# Altium PCB DATALOGER_RevA.PcbDoc (part 1 of 3)
Units mil, origin at the board's own origin, x right, y up, seen from the top; angles counter-clockwise.
Board outline 3937.01 x 3149.61 mil, 2 copper layers (Top Layer, Bottom Layer), stack 62.19 mil thick; 129 components, 81 nets, 422 pads, 180 vias.
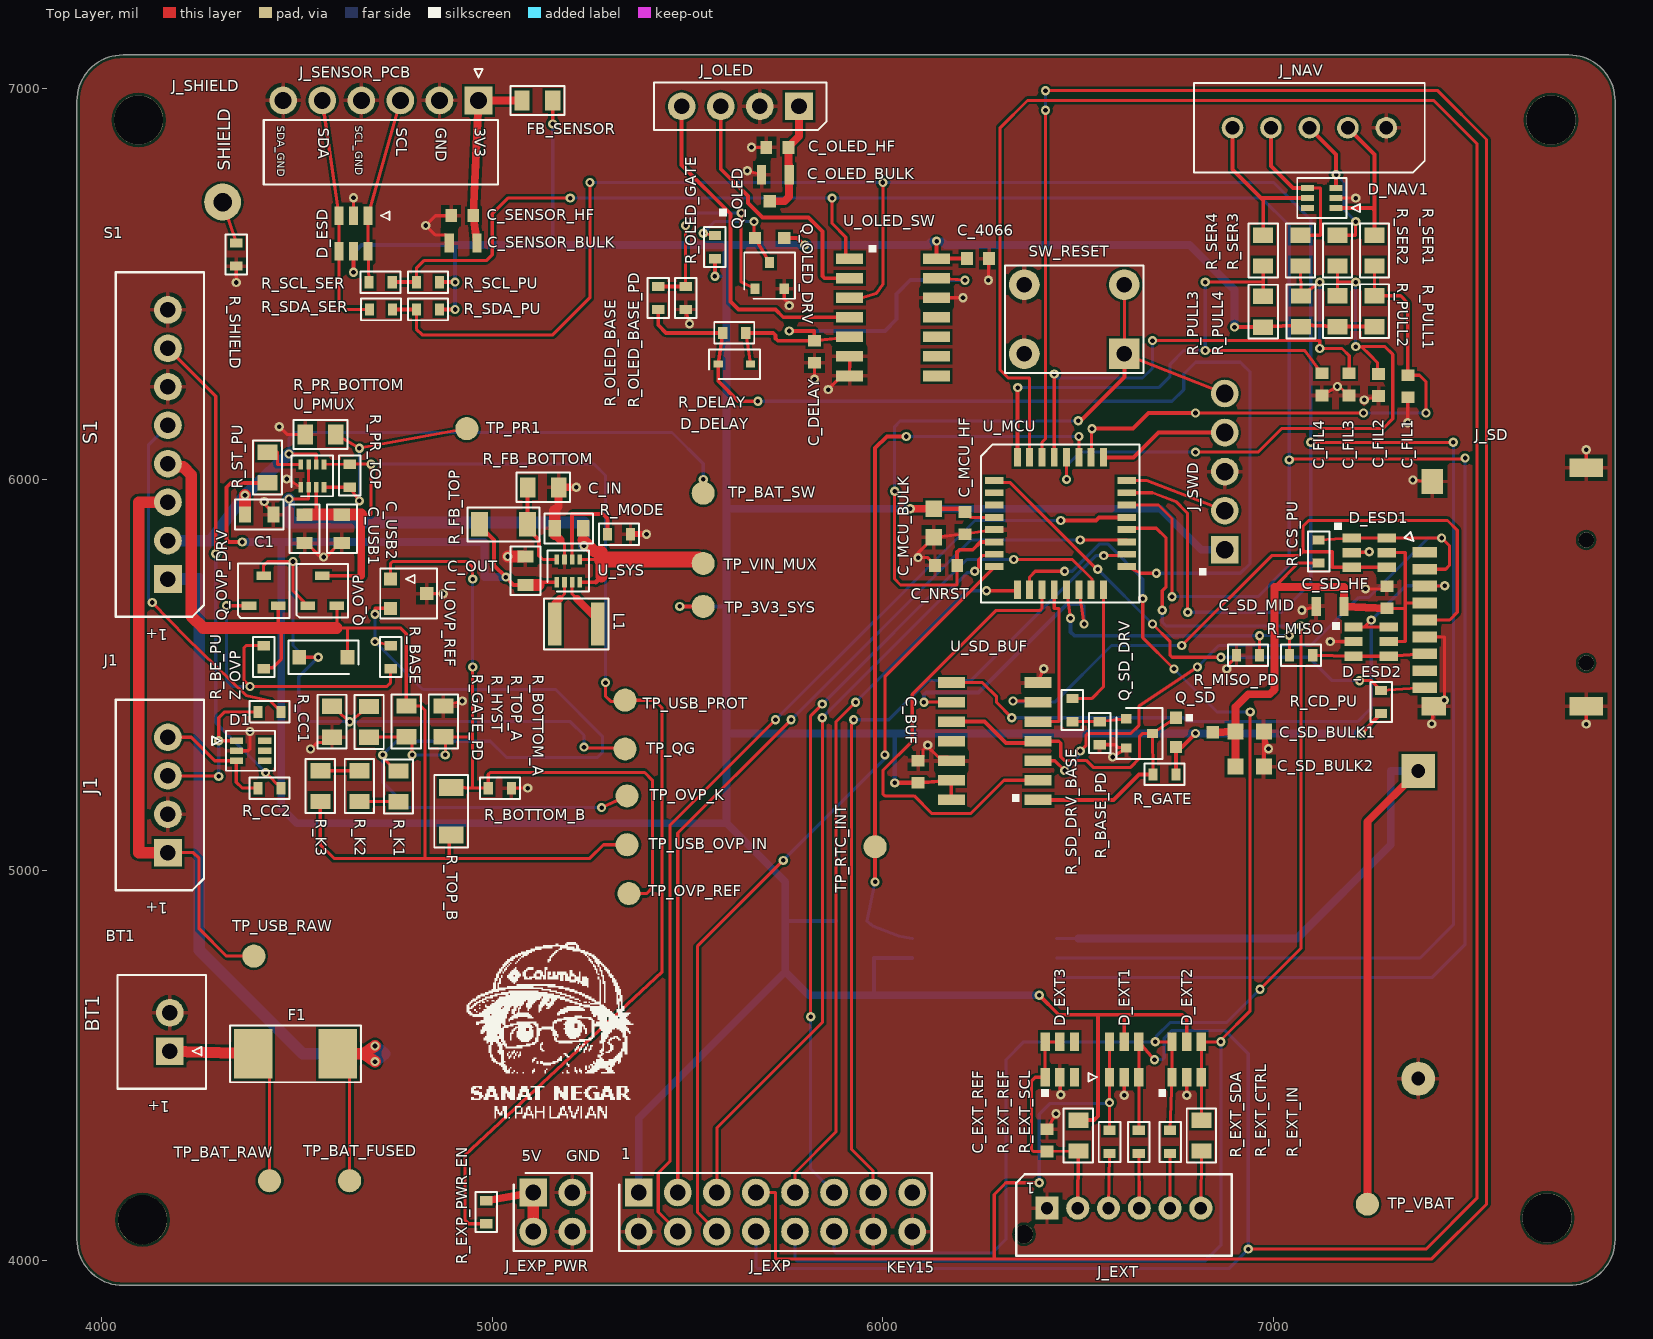
[diagram p0: Top Layer view]
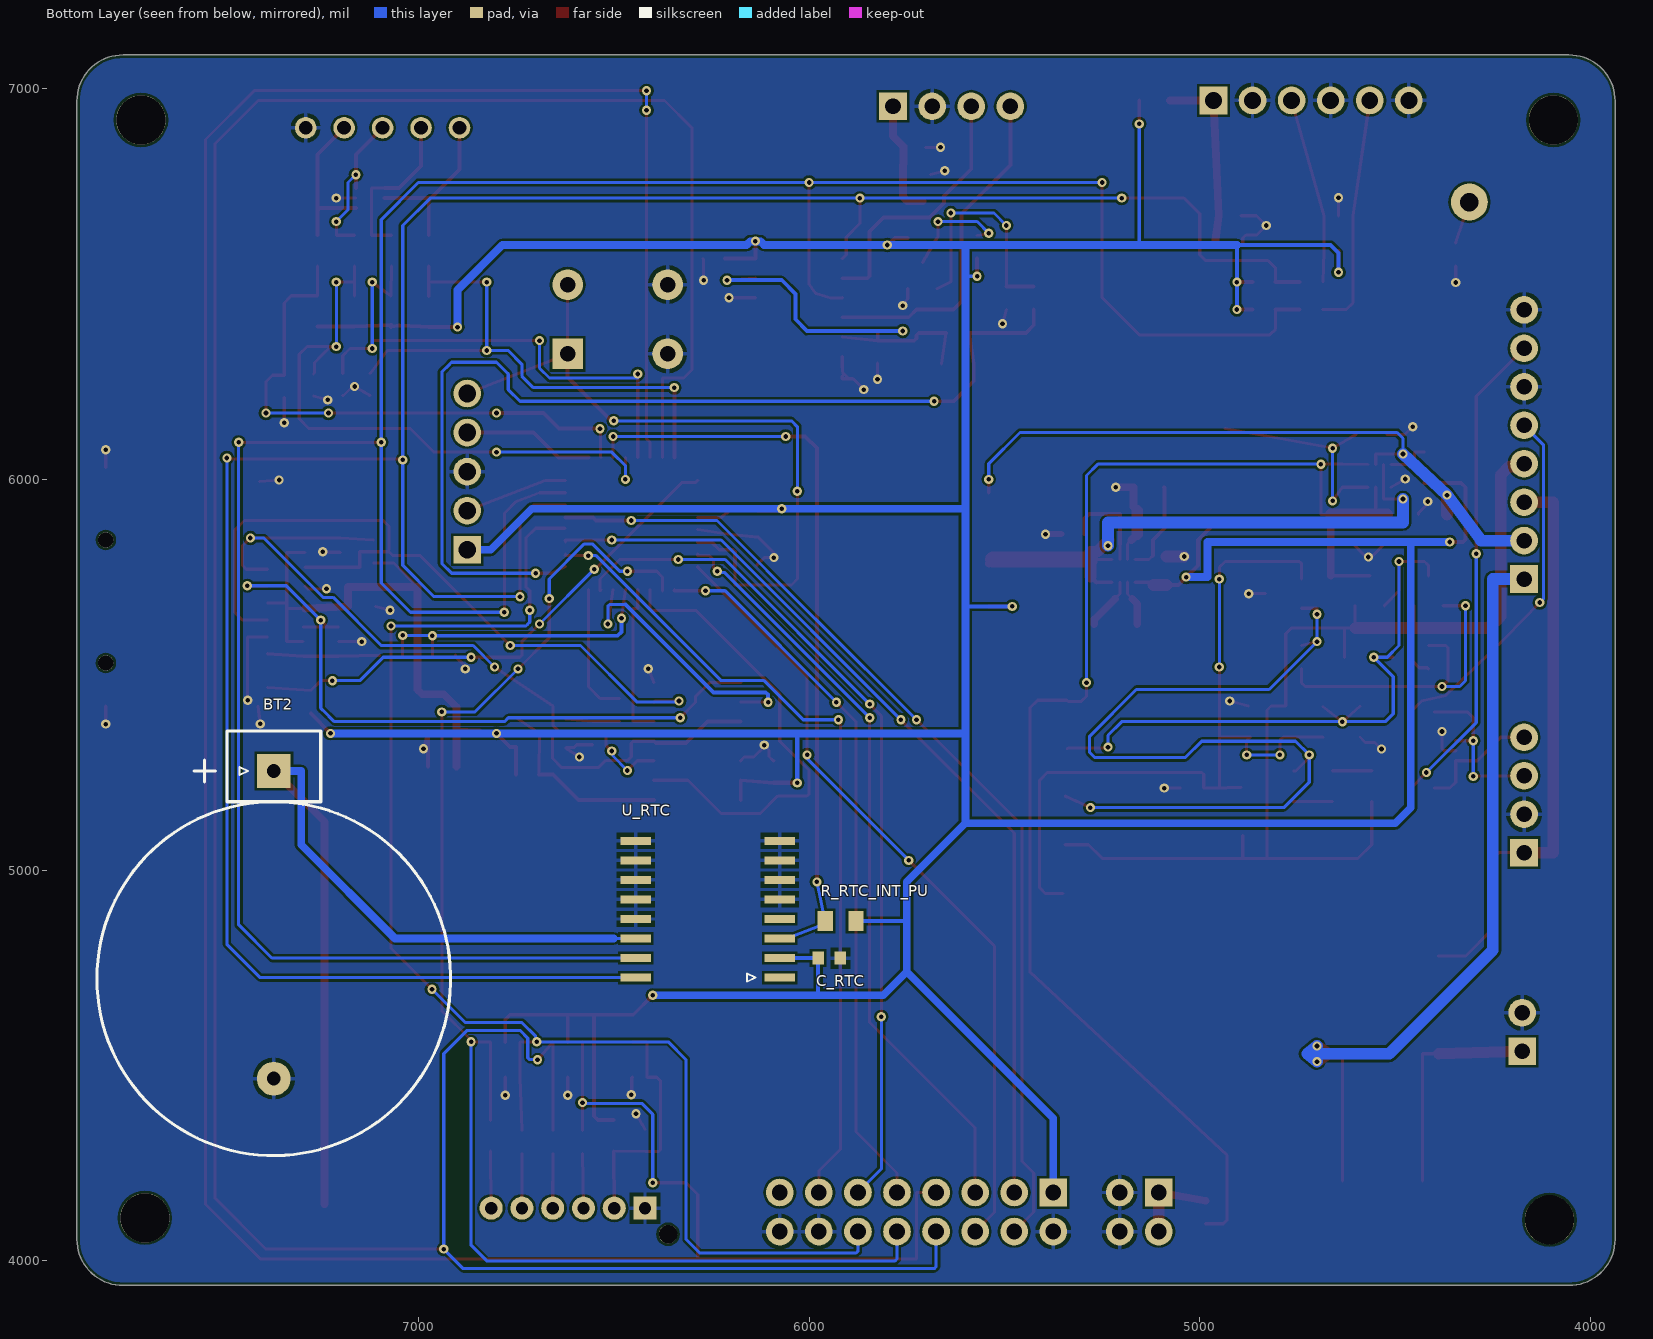
[diagram p1: Bottom Layer view, seen from below]

## Layer stack, top to bottom
Top Solder: solder mask 0.4, Solder Resist, Dk 3.5
Top Layer: signal copper 1.4
Dielectric 1: dielectric 59.39, FR-4, Dk 4.8
Bottom Layer: signal copper 1.4
Bottom Solder: solder mask 0.4, Solder Resist, Dk 3.5

## Board outline
4055.12,3937.01 cw(c4055.12,4055.12) 3937.01,4055.12 3937.01,6968.5 cw(c4055.12,6968.5) 4055.12,7086.61 7755.91,7086.61 cw(c7755.91,6968.5) 7874.02,6968.5 7874.02,4055.12 cw(c7755.91,4055.12) 7755.91,3937.01

## Design rules (kind name [scope] priority, off if disabled: settings)
BoardOutlineClearance BoardEdge_J_SD [InComponent('J_SD')] p1: gap=27.56 ignorepadtopadclearanceinfootprint=FALSE
BoardOutlineClearance [All] p2: gap=7.87 ignorepadtopadclearanceinfootprint=FALSE
Clearance [All] p1: gap=6 ignorepadtopadclearanceinfootprint=FALSE
ComponentClearance CC_EXC_QOLED_ROLED_GATE [InComponent('Q_OLED') vs InComponent('R_OLED_GATE')] p1: gap=-1 collisioncheckmode=3 verticalgap=10 showdistances=FALSE
ComponentClearance ComponentClearance_Courtyard [All] p2: gap=10 collisioncheckmode=3 verticalgap=10 showdistances=TRUE checkcomponentboundary=TRUE
ComponentClearance [All] p3 off: gap=10 collisioncheckmode=3 verticalgap=10 showdistances=TRUE checkcomponentboundary=TRUE
HoleSize [All] p1: absolutevalues=TRUE maxlimit=129.92 minlimit=11.81 maxpercent=80.000 minpercent=20.000
MinimumSolderMaskSliver [All] p1: minsoldermaskwidth=3.94
PolygonConnect PolygonConnect_GND_Via_Direct [IsVia AND InNet('GND')] p1: connectstyle=Direct reliefconductorwidth=10 reliefentries=4 polygonreliefangle="90 Angle" airgapwidth=10 // T24: Direct polygon connection for GND vias only
PolygonConnect [All] p2: connectstyle=Relief reliefconductorwidth=10 reliefentries=4 polygonreliefangle="90 Angle" airgapwidth=10
RoutingVias [All] p1: holewidth=11.81 width=23.62 viastyle="Through Hole" minholewidth=11.81 minwidth=23.62 maxholewidth=11.81 maxwidth=23.62
SilkToSilkClearance [All] p1: silktosilkclearance=5.91
SilkToSolderMaskClearance [IsPad] p1: minsilkscreentomaskgap=5.91 clearancetoexposedcopper=TRUE
SolderMaskExpansion [All] p1: expansion=1.97 istentingtop=FALSE
Width Width_BuckBoost_SW [InNet('NetL1_1') OR InNet('NetL1_2')] p1: maxlimit=40 minlimit=8 preferedwidth=20
Width Width_Power_Aux [InNet('SD_VDD') OR InNet('OLED_VDD') OR InNet('SENSOR_3V3') OR InNet('USB_5V_AUX')] p2: maxlimit=30 minlimit=8 preferedwidth=20
Width Width_Power_3V3 [InNet('3V3_SYS')] p3: maxlimit=50 minlimit=8 preferedwidth=30
Width Width_Power_USB [InNet('USB_VBUS_RAW') OR InNet('USB_OVP_IN') OR InNet('USB_VBUS_PROT')] p4: maxlimit=50 minlimit=8 preferedwidth=30
Width Width_Power_Battery [InNet('BAT_RAW') OR InNet('BAT_FUSED') OR InNet('BAT_SW') OR InNet('VIN_MUX')] p5: maxlimit=60 minlimit=8 preferedwidth=40
Width [All] p6: maxlimit=50 minlimit=6 preferedwidth=10
25 further rules are at their usual default settings.

## Classes and differential pairs
component class 07_EXPANSION: C_EXT_REF D_EXT1 D_EXT2 D_EXT3 J_EXP J_EXP_PWR J_EXT R_EXP_PWR_EN R_EXT_CTRL R_EXT_IN R_EXT_REF R_EXT_SCL R_EXT_SDA
component class 06_OLED_SHT3X: C_4066 C_DELAY C_OLED_BULK C_OLED_HF C_SENSOR_BULK C_SENSOR_HF D_DELAY D_ESD FB_SENSOR J_OLED J_SENSOR_PCB J_SHIELD Q_OLED Q_OLED_DRV R_DELAY R_OLED_BASE R_OLED_BASE_PD R_OLED_GATE R_SCL_PU R_SCL_SER R_SDA_PU R_SDA_SER R_SHIELD U_OLED_SW
component class 05_RTC: BT2 C_RTC R_RTC_INT_PU TP_RTC_INT TP_VBAT U_RTC
component class 04_NAVIGATION: C_FIL1 C_FIL2 C_FIL3 C_FIL4 D_NAV1 J_NAV R_PULL1 R_PULL2 R_PULL3 R_PULL4 R_SER1 R_SER2 R_SER3 R_SER4 SW_NAV1 SW_NAV2 SW_NAV3 SW_NAV4
component class 03_MICROSD: C_BUF C_SD_BULK1 C_SD_BULK2 C_SD_HF C_SD_MID D_ESD1 D_ESD2 J_SD Q_SD Q_SD_DRV R_BASE_PD R_CD_PU R_CS_PU R_GATE R_MISO R_MISO_PD R_SD_DRV_BASE U_SD_BUF
component class 02_MCU_CORE: C_MCU_BULK C_MCU_HF C_NRST J_SWD SW_RESET U_MCU
component class 01_POWER: BT1 C1 C_IN C_OUT C_USB1 C_USB2 D1 F1 J1 L1 Q_OVP Q_OVP_DRV R_BASE R_BE_PU R_BOTTOM_A R_BOTTOM_B R_CC1 R_CC2 R_FB_BOTTOM R_FB_TOP R_GATE_PD R_HYST R_K1 R_K2 R_K3 R_MODE R_PR_BOTTOM R_PR_TOP R_ST_PU R_TOP_A R_TOP_B S1 TP_3V3_SYS TP_BAT_FUSED TP_BAT_RAW TP_BAT_SW TP_OVP_K TP_OVP_REF TP_PR1 TP_QG TP_USB_OVP_IN TP_USB_PROT TP_USB_RAW TP_VIN_MUX U_OVP_REF U_PMUX U_SYS Z_OVP

## Components (designator, comment, footprint, x,y, rotation, side; value= is the part's Value field where it differs from the comment)
BT1 "2xAA ALKALINE" JST_XH_B2B_XH_A_2P_THT 4175,4585.79 r90 top locked
BT2 "CR2032 HOLDER" CR2032_HOLDER_VERTICAL_P20_D0P90_2P_THT_REV_B 7370,4860 r90 bottom locked
C1 "4.7uF 50V X5R" TDK_C2012_0805_CAP_2P 4403.58,5910 r0 top locked
C_4066 "100nF 50V X7R" SAMSUNG_CL10_0603_CAP_2P 6243.35,6565 r0 top locked
C_BUF "100nF 50V X7R" SAMSUNG_CL10_0603_CAP_2P 6090,5251.65 r270 top locked
C_DELAY "100nF 50V X7R" SAMSUNG_CL10_0603_CAP_2P 5825,6326.65 r270 top locked
C_EXT_REF "100nF 50V X7R" SAMSUNG_CL10_0603_CAP_2P 6420,4308.35 r90 top locked
C_FIL1 "100nF 50V X7R" SAMSUNG_CL10_0603_CAP_2P 7343.43,6238.35 r270 top locked
C_FIL2 "100nF 50V X7R" SAMSUNG_CL10_0603_CAP_2P 7268.43,6241.69 r270 top locked
C_FIL3 "100nF 50V X7R" SAMSUNG_CL10_0603_CAP_2P 7193.43,6243.35 r270 top locked
C_FIL4 "100nF 50V X7R" SAMSUNG_CL10_0603_CAP_2P 7123.43,6243.35 r270 top locked
C_IN "22uF 35V X5R" TDK_C2012_0805_CAP_2P 5196.42,5875 r0 top locked
C_MCU_BULK "4.7uF 25V X5R" TDK_C2012_0805_REFLOW_2P 6130,5888.58 r90 top locked
C_MCU_HF "100nF 50V X7R" SAMSUNG_CL10_0603_CAP_2P 6210,5888.35 r90 top locked
C_NRST "100nF 50V X7R" SAMSUNG_CL10_0603_CAP_2P 6161.65,5780 r180 top locked
C_OLED_BULK "10uF 25V X5R +/-10%" MURATA_GRM21_0805_CAP_2P 5725,6780 r0 top
C_OLED_HF "100nF 50V X7R" SAMSUNG_CL10_0603_CAP_2P 5730,6850 r0 top
C_OUT "47uF 10V X5R" TDK_C2012_0805_CAP_2P 5085,5766.42 r90 top locked
C_RTC "100nF 50V X7R" SAMSUNG_CL10_0603_CAP_2P 5948.35,4775 r180 bottom locked
C_SD_BULK1 "22uF 25V X5R +/-20%" TDK_C2012_0805_REFLOW_2P 6938.58,5355 r180 top locked
C_SD_BULK2 "22uF 25V X5R +/-20%" TDK_C2012_0805_REFLOW_2P 6938.58,5265 r180 top locked
C_SD_HF "100nF 50V X7R" SAMSUNG_CL10_0603_CAP_2P 7290,5698.35 r270 top locked
C_SD_MID "10uF 25V X5R +/-10%" MURATA_GRM21_0805_CAP_2P 7144.57,5675 r0 top locked
C_SENSOR_BULK "10uF 25V X5R +/-10%" MURATA_GRM21_0805_CAP_2P 4925.43,6605 r0 top locked
C_SENSOR_HF "100nF 50V X7R" SAMSUNG_CL10_0603_CAP_2P 4923.35,6675 r0 top locked
C_USB1 "22uF 35V X5R" TDK_C2012_0805_CAP_2P 4520,5873.58 r90 top locked
C_USB2 "22uF 35V X5R" TDK_C2012_0805_CAP_2P 4615,5873.58 r90 top locked
D1 "SMF05C.TCT" SEMTECH_SC70_6L_SMF05C 4381.42,5305.59 r270 top locked
D_DELAY "1N4148WS" DIODES_SOD323_1N4148WS_2P 5620,6295 r0 top locked
D_ESD "USBLC6-2SC6" ST_SOT23_6L_USBLC6_6P 4645,6629.72 r270 top locked
D_ESD1 "USBLC6-2SC6" ST_SOT23_6L_USBLC6_6P 7244.72,5812.6 r0 top locked
D_ESD2 "USBLC6-2SC6" ST_SOT23_6L_USBLC6_6P 7249.72,5585 r0 top locked
D_EXT1 "USBLC6-2SC6" ST_SOT23_6L_USBLC6_6P 6617.6,4515.28 r90 top locked
D_EXT2 "USBLC6-2SC6" ST_SOT23_6L_USBLC6_6P 6777.6,4515.28 r90 top locked
D_EXT3 "USBLC6-2SC6" ST_SOT23_6L_USBLC6_6P 6452.6,4515.28 r90 top locked
D_NAV1 "SMF05C.TCT" SEMTECH_SC70_6L_SMF05C 7123.43,6720 r90 top locked
F1 "2A FAST-ACTING FUSE" JDT_JFC2410FS_2P 4496.73,4530 r180 top locked
FB_SENSOR "220R @100MHz" RES_0805_SHARED_2P 5115.63,6970 r180 top locked
J1 "USB-C PANEL LOGICAL" JST_XH_B4B_XH_A_4P_THT 4170,5192.36 r90 top locked
J_EXP "J_EXP 2x8 2.54mm" GENERIC_HEADER_2X8_P2P54_THT 5725,4125 r0 top locked
J_EXP_PWR "J_EXP_PWR 2x2 2.54mm" GENERIC_HEADER_2X2_P2P54_THT 5155,4125 r0 top locked
J_EXT "J_EXT JST PA 6P" JST_PA_B06B_PASK_1N_6P_THT 6616.85,4135 r180 top locked value="JST PA 6P 2.0mm"
J_NAV "5P ZZ-MS P2.50mm" SHOUHAN_2P50_1X05_ZZMS_THT 7091.57,6900 r180 top locked value="2.54mm-5P ZZ-MS"
J_OLED "1x4 FEMALE 2.54mm" GENERIC_SOCKET_1X4_P2P54_THT 5635,6955 r180 top locked
J_SD "MR01A-01245" ATOM_MR01A_01245_10P 7800,5725 r90 top locked
J_SENSOR_PCB "2510 1x6 MALE 2.54mm" GENERIC_2510_1X6_P2P54_THT 4715,6970 r180 top locked
J_SHIELD "SHIELD DRAIN WIRE" WIRE_DRAIN_1P_D1P20_P2P40_THT 4310,6710 r90 top locked
J_SWD "PLS-2.54-1X40GF / USE 1x5" GOSUN_PLS_2P54_1X5_THT 6875,6020 r90 top locked
L1 "1uH" MURATA_DFE322512F_2P 5215.12,5630 r180 top locked
Q_OLED "AO3401A" AOS_SOT23_AO3401A_3P 5710,6665 r0 top locked
Q_OLED_DRV "BC847B" NEXPERIA_SOT23_TO236AB_3P 5710,6521.54 r0 top locked
Q_OVP "FSS2301S" FOSAN_SOT23_FSS2301S_3P 4565,5715 r90 top locked
Q_OVP_DRV "BC857BLT1G" ONSEMI_CASE318_SOT23_3P 4415,5715 r90 top locked
Q_SD "AO3401A" AOS_SOT23_AO3401A_3P 6797.24,5352.6 r270 top locked
Q_SD_DRV "BC847B" NEXPERIA_SOT23_TO236AB_3P 6656.54,5350 r270 top locked
R_BASE "30k 1%" RES_0603_SHARED_2P 4740,5545 r90 top locked
R_BASE_PD "100k 1%" RES_0603_SHARED_2P 6555,5350.47 r90 top locked
R_BE_PU "100k 1%" RES_0603_SHARED_2P 4415,5545 r90 top locked
R_BOTTOM_A "10k 0.5%" RES_0805_SHARED_2P 4875,5380.63 r270 top locked
R_BOTTOM_B "47k 1%" RES_0603_SHARED_2P 5019.53,5210 r0 top locked
R_CC1 "5.1k 1%" RES_0603_SHARED_2P 4430,5405 r0 top locked
R_CC2 "5.1k 1%" RES_0603_SHARED_2P 4430,5210 r0 top locked
R_CD_PU "100k 1%" RES_0603_SHARED_2P 7275,5430.47 r90 top locked
R_CS_PU "100k 1%" RES_0603_SHARED_2P 7115,5815.47 r270 top locked
R_DELAY "47k 1%" RES_0603_SHARED_2P 5619.53,6375 r0 top locked
R_EXP_PWR_EN "0R" RES_0603_SHARED_2P 4985,4124.53 r90 top locked
R_EXT_CTRL "330R" RES_0603_SHARED_2P 6735,4304.53 r270 top locked value="330R 1%"
R_EXT_IN "1k 1%" RES_0805_SHARED_2P 6815,4320.63 r270 top locked
R_EXT_REF "1k 1%" RES_0805_SHARED_2P 6500,4320.63 r270 top locked
R_EXT_SCL "330R" RES_0603_SHARED_2P 6580,4304.53 r90 top locked value="330R 1%"
R_EXT_SDA "330R" RES_0603_SHARED_2P 6655,4304.53 r270 top locked value="330R 1%"
R_FB_BOTTOM "91k 1%" RES_0805_SHARED_2P 5130.63,5980 r180 top locked
R_FB_TOP "510k 1%" UNIROYAL_RES_1206_2P 5028.98,5885 r0 top locked
R_GATE "100k 1%" RES_0603_SHARED_2P 6720.47,5245 r0 top locked
R_GATE_PD "10k 0.5%" RES_0805_SHARED_2P 4590,5380 r270 top locked
R_HYST "91k 1%" RES_0805_SHARED_2P 4685,5379.37 r270 top locked
R_K1 "1k 1%" RES_0805_SHARED_2P 4760,5214.37 r90 top locked
R_K2 "1k 1%" RES_0805_SHARED_2P 4660,5215 r270 top locked
R_K3 "1k 1%" RES_0805_SHARED_2P 4560,5215 r90 top locked
R_MISO "22ohm 1%" RES_0603_SHARED_2P 7070.47,5550 r180 top locked
R_MISO_PD "100k 1%" RES_0603_SHARED_2P 6934.53,5550 r180 top locked
R_MODE "0R" RES_0603_SHARED_2P 5324.53,5860 r180 top locked
R_OLED_BASE "10kohm 1% 100mW" RES_0603_SHARED_2P 5425,6464.53 r90 top locked
R_OLED_BASE_PD "100k 1%" RES_0603_SHARED_2P 5495,6464.53 r270 top locked
R_OLED_GATE "100k 1%" RES_0603_SHARED_2P 5570,6594.53 r270 top locked
R_PR_BOTTOM "10k 0.5%" RES_0805_SHARED_2P 4560.63,6115 r180 top locked
R_PR_TOP "30k 1%" RES_0603_SHARED_2P 4635,6009.53 r270 top locked
R_PULL1 "10k 0.5%" RES_0805_SHARED_2P 7258.43,6430.63 r270 top locked
R_PULL2 "10k 0.5%" RES_0805_SHARED_2P 7163.43,6430.63 r270 top locked
R_PULL3 "10k 0.5%" RES_0805_SHARED_2P 7070,6430 r270 top locked
R_PULL4 "10k 0.5%" RES_0805_SHARED_2P 6973.43,6429.37 r270 top locked
R_RTC_INT_PU "10k 0.5%" RES_0805_SHARED_2P 5919.37,4870 r0 bottom locked
R_SCL_PU "2.4k 1% 0.1W" RES_0603_SHARED_2P 4835.47,6505 r0 top locked
R_SCL_SER "47R 1% 0.1W" RES_0603_SHARED_2P 4714.53,6505 r0 top locked
R_SD_DRV_BASE "10kohm 1% 100mW" RES_0603_SHARED_2P 6485,5409.53 r90 top locked
R_SDA_PU "2.4k 1% 0.1W" RES_0603_SHARED_2P 4835.47,6435 r0 top locked
R_SDA_SER "47R 1% 0.1W" RES_0603_SHARED_2P 4715.47,6435 r0 top locked
R_SER1 "1k 1%" RES_0805_SHARED_2P 7258.43,6585.63 r270 top locked
R_SER2 "1k 1%" RES_0805_SHARED_2P 7163.43,6585.63 r270 top locked
R_SER3 "1k 1%" RES_0805_SHARED_2P 7068.43,6585.63 r270 top locked
R_SER4 "1k 1%" RES_0805_SHARED_2P 6973.43,6585.63 r270 top locked
R_SHIELD "0R" RES_0603_SHARED_2P 4345,6575.47 r90 top locked
R_ST_PU "10k 0.5%" RES_0805_SHARED_2P 4425,6030.63 r90 top locked
R_TOP_A "10k 0.5%" RES_0805_SHARED_2P 4780,5380.63 r90 top locked
R_TOP_B "510k 1%" UNIROYAL_RES_1206_2P 4895,5151.02 r90 top
S1 "4-POLE MAINTAINED" JST_XH_B8B_XH_A_8P_THT 4170,6089.49 r90 top locked
SW_RESET "TP-1101A 6X6X5" TACT_6X6_H5_P6P5_X4P5_4P_THT_REV_A 6490,6410 r180 top locked value="TACT SWITCH 6X6X5"
TP_3V3_SYS "TESTPOINT" TESTPOINT_GENERIC_1P5MM 5540,5675 r90 top locked
TP_BAT_FUSED "TESTPOINT" TESTPOINT_GENERIC_1P5MM 4635,4205 r90 top locked
TP_BAT_RAW "TESTPOINT" TESTPOINT_GENERIC_1P5MM 4430,4205 r90 top locked
TP_BAT_SW "TESTPOINT" TESTPOINT_GENERIC_1P5MM 5540,5965 r90 top locked
TP_OVP_K "TESTPOINT" TESTPOINT_GENERIC_1P5MM 5345,5190 r90 top locked
TP_OVP_REF "TESTPOINT" TESTPOINT_GENERIC_1P5MM 5350,4940 r90 top locked
TP_PR1 "TESTPOINT" TESTPOINT_GENERIC_1P5MM 4935,6130 r90 top locked
TP_QG "TESTPOINT" TESTPOINT_GENERIC_1P5MM 5340,5310 r90 top locked
TP_RTC_INT "TESTPOINT" TESTPOINT_GENERIC_1P5MM 5980,5060 r90 top locked
TP_USB_OVP_IN "TESTPOINT" TESTPOINT_GENERIC_1P5MM 5345,5065 r90 top locked
TP_USB_PROT "TESTPOINT" TESTPOINT_GENERIC_1P5MM 5340,5435 r90 top locked
TP_USB_RAW "TESTPOINT" TESTPOINT_GENERIC_1P5MM 4390,4780 r90 top locked
TP_VBAT "TESTPOINT" TESTPOINT_GENERIC_1P5MM 7240,4145 r90 top locked
TP_VIN_MUX "TESTPOINT" TESTPOINT_GENERIC_1P5MM 5540,5785 r90 top locked
U_MCU "STM32G070KBT6" ST_LQFP32_7X7_P0P8_32P 6454.29,5887.24 r0 top locked
U_OLED_SW "74HC4066D,653" NEXPERIA_SOT108_1_SO14_14P 6026.22,6415 r270 top locked
U_OVP_REF "TS431BCX RFG" TSC_SOT23_TS431_3P 4786.26,5707.6 r0 top locked
U_PMUX "TPS2116DRLR" TI_DRL0008A_8P 4539.84,6009.13 r90 top locked
U_RTC "DS3231SN#" MAXIM_W16H2_SO16_90_0107 6259.45,4900 r0 bottom locked
U_SD_BUF "74HC125D,653" NEXPERIA_SOT108_1_SO14_14P 6286.22,5330 r90 top locked
U_SYS "TPS631000DRLR" TI_DRL0008A_8P 5194.84,5765.87 r90 top locked
Z_OVP "BZT52C6V2-7-F" DIODES_SOD123_2P 4567.99,5545 r180 top locked

## Footprints (in the part's own frame and the unit in brackets; to place one, negate y for a bottom-side part, rotate by r counter-clockwise, add the part's x,y. Pads: shape width x height; smd on the part's side, far side on the other; paste and mask are expansions set on the pad)
AOS_SOT23_AO3401A_3P [mm] "AOS AO3401A SOT23"
  rect 0.8x0.8 smd paste+0: 1(-0.95,-1.2) 2(0.95,-1.2) 3(0,1.2)
  silkscreen extent -3.29,0.22 -2.78,0.72
ATOM_MR01A_01245_10P [mm] "ATOM MR01A-01245 microSD socket"
  rect 0.7x1.6 smd paste+0: 1(2.25,10.5) 2(1.15,10.5) 3(0.05,10.5) 4(-1.05,10.5) 5(-2.15,10.5) 6(-3.25,10.5) 7(-4.35,10.5) 8(-5.45,10.5) 9(-6.55,10.5)
  rect 1.2x2.2 smd paste+0: 10(-7.75,0) 10(7.75,0)
  rect 1.2x1.6 smd paste+0: 10(-7.75,9.9)
  rect 1.6x1.4 smd paste+0: 10(6.85,10)
  shape4 1x1 hole 1 unplated: ""(-4.95,0) ""(3.05,0)
CR2032_HOLDER_VERTICAL_P20_D0P90_2P_THT_REV_B [mm] "CR2032 vertical THT holder Rev-B candidate"
  rect 2.2x2.2 hole 0.9 paste-2539.97: 1(10,0)
  round 2.2 hole 0.9 paste-2539.97: 2(-10,0)
  silkscreen extent -15,-11.5 12.6,11.5
DIODES_SOD123_2P [mm] "Datalogger Rev-A G007"
  rect 0.9x0.95 smd paste+0: 1(-1.575,0) 2(1.575,0)
  silkscreen extent -2.27,-1.1 2.27,1.1
DIODES_SOD323_1N4148WS_2P [mm] "1N4148WS SOD323"
  rect 0.59x0.45 smd paste+0: 1(-1.055,0) 2(1.055,0)
  silkscreen extent -1.65,-0.95 1.65,0.95
FOSAN_SOT23_FSS2301S_3P [mm] "Datalogger Rev-A G008"
  rect 0.56x0.95 smd paste+0: 1(-0.975,0.95) 2(-0.975,-0.95) 3(0.975,0)
  silkscreen extent -1.75,-1.68 1.75,1.68
GENERIC_2510_1X6_P2P54_THT [mm] "Generic 2510-style 1x6 straight male THT PCB harness header"
  rect 1.8x1.8 hole 1.1 paste-2539.97: 1(-6.35,0)
  round 1.8 hole 1.1 paste-2539.97: 2(-3.81,0) 3(-1.27,0) 4(1.27,0) 5(3.81,0) 6(6.35,0)
  silkscreen extent -7.62,1.27 7.62,5.46
GENERIC_HEADER_2X2_P2P54_THT [mm] "Generic 2x2 vertical male THT header"
  rect 1.8x1.8 hole 1.02 paste-2539.97: 1(-1.27,1.27)
  round 1.8 hole 1.02 paste-2539.97: 2(-1.27,-1.27) 3(1.27,1.27) 4(1.27,-1.27)
  silkscreen extent -2.54,-2.54 2.54,2.54
GENERIC_HEADER_2X8_P2P54_THT [mm] "Generic 2x8 vertical male THT header"
  rect 1.8x1.8 hole 1.02 paste-2539.97: 1(-8.89,1.27)
  round 1.8 hole 1.02 paste-2539.97: 2(-8.89,-1.27) 3(-6.35,1.27) 4(-6.35,-1.27) 5(-3.81,1.27) 6(-3.81,-1.27) 7(-1.27,1.27) 8(-1.27,-1.27) 9(1.27,1.27) 10(1.27,-1.27) 11(3.81,1.27) 12(3.81,-1.27) 13(6.35,1.27) 14(6.35,-1.27) 15(8.89,1.27) 16(8.89,-1.27)
  silkscreen extent -10.16,-2.54 10.16,2.54
GENERIC_SOCKET_1X4_P2P54_THT [mm] "Generic 1x4 straight female THT socket"
  rect 1.8x1.8 hole 1.02 paste-2539.97: 1(-3.81,0)
  round 1.8 hole 1.02 paste-2539.97: 2(-1.27,0) 3(1.27,0) 4(3.81,0)
  silkscreen extent -5.6,-1.55 5.6,1.55
GOSUN_PLS_2P54_1X5_THT [mm] "Gosun PLS 2.54 1x5 cut from 1x40 stock"
  rect 1.8x1.8 hole 1.15: 1(-5.08,0)
  round 1.8 hole 1.15: 2(-2.54,0) 3(0,0) 4(2.54,0) 5(5.08,0)
  silkscreen extent -6.76,1.18 -6.26,1.68
JDT_JFC2410FS_2P [mm] "Datalogger Rev-A G003"
  rect 2.5x3.2 smd paste+0: 1(-2.75,0) 2(2.75,0)
  silkscreen extent -4.25,-1.85 4.25,1.85
JST_PA_B06B_PASK_1N_6P_THT [mm] "JST PA B06B-PASK-1N"
  rect 1.5x1.5 hole 0.8 paste-2539.97: 1(5,0)
  round 1.5 hole 0.8 paste-2539.97: 2(3,0) 3(1,0) 4(-1,0) 5(-3,0) 6(-5,0)
  round 1.2 hole 1.2 unplated paste-2539.97: ""(6.5,1.7)
  silkscreen extent -7,-2.2 7,3.1
JST_XH_B2B_XH_A_2P_THT [mm] "JST XH B2B-XH-A top-entry THT"
  rect 1.8x1.8 hole 1 paste-2539.97: 1(-1.25,0)
  round 1.8 hole 1 paste-2539.97: 2(1.25,0)
  silkscreen extent -3.7,-2.35 3.7,3.4
JST_XH_B4B_XH_A_4P_THT [mm] "JST XH B4B-XH-A top-entry THT"
  rect 1.8x1.8 hole 1 paste-2539.97: 1(-3.75,0)
  round 1.8 hole 1 paste-2539.97: 2(-1.25,0) 3(1.25,0) 4(3.75,0)
  silkscreen extent -6.2,-2.35 6.2,3.4
JST_XH_B8B_XH_A_8P_THT [mm] "JST XH B8B-XH-A top-entry THT"
  rect 1.8x1.8 hole 1 paste-2539.97: 1(-8.75,0)
  round 1.8 hole 1 paste-2539.97: 2(-6.25,0) 3(-3.75,0) 4(-1.25,0) 5(1.25,0) 6(3.75,0) 7(6.25,0) 8(8.75,0)
  silkscreen extent -11.2,-2.35 11.2,3.4
MAXIM_W16H2_SO16_90_0107 [mm] "DS3231SN# W16#H2 / SO16 300mil"
  rect 1.98x0.53 smd paste+0: 1(-4.685,4.445) 2(-4.685,3.175) 3(-4.685,1.905) 4(-4.685,0.635) 5(-4.685,-0.635) 6(-4.685,-1.905) 7(-4.685,-3.175) 8(-4.685,-4.445) 9(4.685,-4.445) 10(4.685,-3.175) 11(4.685,-1.905) 12(4.685,-0.635) 13(4.685,0.635) 14(4.685,1.905) 15(4.685,3.175) 16(4.685,4.445)
MURATA_DFE322512F_2P [mm] "Datalogger Rev-A G002"
  rect 0.9x2.8 smd paste+0: 1(-1.4,0) 2(1.4,0)
  silkscreen extent -2.1,-1.65 2.1,1.65
MURATA_GRM21_0805_CAP_2P [mm] "Murata GRM21 2012/0805"
  rect 0.6x1.25 smd paste+0: 1(-0.9,0) 2(0.9,0)
NEXPERIA_SOT23_TO236AB_3P [mm] "Nexperia BC847B SOT23/TO-236AB"
  rect 0.6x0.7 smd paste+0: 1(-0.95,-0.85) 2(0.95,-0.85) 3(0,0.85)
  silkscreen extent -1.65,-1.5 1.65,1.5
NEXPERIA_SOT108_1_SO14_14P [mm] "Nexperia SO14/SOT108-1"
  rect 0.7x1.75 smd paste+0: 1(-3.81,-2.825) 2(-2.54,-2.825) 3(-1.27,-2.825) 4(0,-2.825) 5(1.27,-2.825) 6(2.54,-2.825) 7(3.81,-2.825) 8(3.81,2.825) 9(2.54,2.825) 10(1.27,2.825) 11(0,2.825) 12(-1.27,2.825) 13(-2.54,2.825) 14(-3.81,2.825)
  silkscreen extent -4.7,-1.59 -4.2,-1.08
ONSEMI_CASE318_SOT23_3P [mm] "Datalogger Rev-A G006"
  rect 0.56x0.95 smd paste+0: 1(-0.975,0.95) 2(-0.975,-0.95) 3(0.975,0)
  silkscreen extent -1.77,-1.68 1.77,1.68
RES_0603_SHARED_2P [mm] "Datalogger Rev-A G010"
  rect 0.6x0.8 smd paste+0: 1(-0.75,0) 2(0.75,0)
  silkscreen extent -1.3,-0.7 1.3,0.7
RES_0805_SHARED_2P [mm] "Datalogger Rev-A G011"
  rect 1x1.3 smd paste+0: 1(-1,0) 2(1,0)
  silkscreen extent -1.75,-0.95 1.75,0.95
SAMSUNG_CL10_0603_CAP_2P [mm] "Samsung CL10 1608/0603 MLCC reflow land"
  rect 0.76x0.85 smd paste+0: 1(-0.72,0) 2(0.72,0)
SEMTECH_SC70_6L_SMF05C [mm] "Datalogger Rev-A G004"
  rect 0.4x0.85 smd paste+0: 1(-0.65,-0.925) 2(0,-0.925) 3(0.65,-0.925) 4(0.65,0.925) 5(0,0.925) 6(-0.65,0.925)
  silkscreen extent -1.3,-1.6 1.3,1.6
SHOUHAN_2P50_1X05_ZZMS_THT [mm] "SHOUHAN 2.54mm-5P ZZ-MS exact Task17 PTH padstack"
  round 1.4 hole 0.9: 1(-5,0) 2(-2.5,0) 3(0,0) 4(2.5,0) 5(5,0)
  silkscreen extent -7.5,-2.9 7.5,2.9
ST_LQFP32_7X7_P0P8_32P [mm] "STM32G070KBT6 LQFP32 copper candidate"
  rect 1.2x0.45 smd paste+0: 1(-4.3,2.8) 2(-4.3,2) 3(-4.3,1.2) 4(-4.3,0.4) 5(-4.3,-0.4) 6(-4.3,-1.2) 7(-4.3,-2) 8(-4.3,-2.8) 17(4.3,-2.8) 18(4.3,-2) 19(4.3,-1.2) 20(4.3,-0.4) 21(4.3,0.4) 22(4.3,1.2) 23(4.3,2) 24(4.3,2.8)
  rect 0.45x1.2 smd paste+0: 9(-2.8,-4.3) 10(-2,-4.3) 11(-1.2,-4.3) 12(-0.4,-4.3) 13(0.4,-4.3) 14(1.2,-4.3) 15(2,-4.3) 16(2.8,-4.3) 25(2.8,4.3) 26(2,4.3) 27(1.2,4.3) 28(0.4,4.3) 29(-0.4,4.3) 30(-1.2,4.3) 31(-2,4.3) 32(-2.8,4.3)
  silkscreen extent -5.15,-5.15 5.15,5.15
ST_SOT23_6L_USBLC6_6P [mm] "ST USBLC6-2SC6 SOT23-6L"
  rect 1.2x0.6 smd paste+0: 1(-1.15,0.95) 2(-1.15,0) 3(-1.15,-0.95) 4(1.15,-0.95) 5(1.15,0) 6(1.15,0.95)
TACT_6X6_H5_P6P5_X4P5_4P_THT_REV_A [mm] "TP-1101A-compatible tactile reset switch"
  rect 2x2 hole 1 paste-2539.97: 1(-3.25,2.25)
  round 2 hole 1 paste-2539.97: 2(-3.25,-2.25) 3(3.25,2.25) 4(3.25,-2.25)
  silkscreen extent -4.5,-3.5 4.5,3.5
TDK_C2012_0805_CAP_2P [mm] "Datalogger Rev-A G009"
  rect 0.8x1.05 smd paste+0: 1(-0.925,0) 2(0.925,0)
  silkscreen extent -1.58,-0.97 1.58,0.97
TDK_C2012_0805_REFLOW_2P [mm] "TDK C2012 EIA0805 manufacturer reflow land"
  rect 1.05x1.05 smd paste+0: 1(-0.925,0) 2(0.925,0)
TESTPOINT_GENERIC_1P5MM [mm] "Datalogger Rev-A G013"
  round 1.5 smd paste-0.75 mask+0: 1(0,0)
TI_DRL0008A_8P [mm] "Datalogger Rev-A G001"
  rect 0.67x0.3 smd paste+0: 1(-0.74,0.75) 2(-0.74,0.25) 3(-0.74,-0.25) 4(-0.74,-0.75) 5(0.74,-0.75) 6(0.74,-0.25) 7(0.74,0.25) 8(0.74,0.75)
  silkscreen extent -1.33,-1.35 1.33,1.35
TSC_SOT23_TS431_3P [mm] "Datalogger Rev-A G005"
  rect 0.85x0.85 smd paste+0: 1(-1.175,0.95) 2(-1.175,-0.95) 3(1.175,0)
  silkscreen extent -1.85,-1.63 1.85,1.63
UNIROYAL_RES_1206_2P [mm] "Datalogger Rev-A G012"
  rect 1.1x1.6 smd paste+0: 1(-1.55,0) 2(1.55,0)
  silkscreen extent -2.35,-1.1 2.35,1.1
WIRE_DRAIN_1P_D1P20_P2P40_THT [mm] "Task20 dedicated shield/drain wire THT solder pad"
  round 2.4 hole 1.2 paste-2539.97: 1(0,0)

## Part data
BT1: library part BATTERY_2XAA_OFFBOARD, "Off-board two-cell AA battery holder logical interface", Manufacturer=PROJECT_LOGICAL, Package=LOGICAL_OFFBOARD, Datasheet=POWER_SCHEMATIC_ENTRY_BASELINE_v0.17_FA.txt, Design_Status=PROJECT_LOGICAL, MPN=BATTERY_2XAA_OFFBOARD, PIN_FUNCTION_SOURCE=PROJECT_LOGICAL_DEFINITION, PIN_NUMBER_SOURCE=PROJECT_LOGICAL_DEFINITION, Qualification_Status=UNQUALIFIED_PENDING_SAVE_REOPEN_AUDIT, Source_Baseline=POWER_SCHEMATIC_ENTRY_BASELINE_v0.17_FA.txt
BT2: library part CR2032_HOLDER_USER_DRAWING, "Datalogger Rev-A CR2032 vertical THT holder, user-confirmed drawing, 20.00 mm pitch", Manufacturer="UNKNOWN - USER DRAWING", Package="Vertical THT, 2-pin, 20.00 mm pitch", Footprint_Target=CR2032_HOLDER_P20_2P_THT, MPN="UNKNOWN - USER DRAWING", Physical_Drawing=USER_CONFIRMED_CR2032_HOLDER_DRAWING_2026-08-22, Pin1_Function=POS_VBAT, Pin1_Physical=RIGHT_HOLE_X_PLUS_10P00_MM_TOP_VIEW, Pin2_Function=NEG_GND, Pin2_Physical=LEFT_HOLE_X_MINUS_10P00_MM_TOP_VIEW, PIN_FUNCTION_SOURCE=USER_CONFIRMED_PHYSICAL_DRAWING, PIN_NUMBER_SOURCE=INTERNAL_CONVENTION, Qualification_Status=UNQUALIFIED_PENDING_SAVE_REOPEN_AUDIT, Source_Baseline=Datalogger_RTC_CR2032_Final_BOM_RevA_v1.2_FA.pdf
C1: library part C2012X5R1H475K125AB, "Battery-side local ceramic capacitor", Manufacturer=TDK, Package="0805 / 2012 metric", Datasheet="TDK exact product data C2012X5R1H475K125AB", Design_Status=CONTROLLED_V0.17_P9, MPN=C2012X5R1H475K125AB, PIN_FUNCTION_SOURCE=MANUFACTURER_DATASHEET, PIN_NUMBER_SOURCE=INTERNAL_CONVENTION, Qualification_Status=UNQUALIFIED_PENDING_SAVE_REOPEN_AUDIT, Source_Baseline=POWER_SCHEMATIC_ENTRY_BASELINE_v0.17_FA.txt
C_4066 C_BUF C_DELAY C_EXT_REF C_FIL1 C_FIL2 C_FIL3 C_FIL4 C_MCU_HF C_NRST C_OLED_HF C_RTC C_SD_HF C_SENSOR_HF: library part CL10B104KB8NNNC, "MCU-core ceramic capacitor", Manufacturer="Samsung Electro-Mechanics", Package="0603 / 1608 metric", Datasheet=https://product.samsungsem.com/mlcc/CL10B104KB8NNN.do, Design_Status=DESIGN_LOCK_MCU_CORE_V2.1_FOOTPRINT_HOLD, MPN=CL10B104KB8NNNC, PIN_FUNCTION_SOURCE=MANUFACTURER_DATASHEET, PIN_NUMBER_SOURCE=INTERNAL_CONVENTION, Qualification_Status=UNQUALIFIED_PENDING_SAVE_REOPEN_AUDIT, Source_Baseline=MCU_SCHEMATIC_ENTRY_BASELINE_v2.1_FA.txt
C_IN C_USB1 C_USB2: library part C2012X5R1V226M125AC, "Power-path ceramic capacitor", Manufacturer=TDK, Package="0805 / 2012 metric", Datasheet="TDK exact product data C2012X5R1V226M125AC", Design_Status=CONTROLLED_V0.17_P9, MPN=C2012X5R1V226M125AC, PIN_FUNCTION_SOURCE=MANUFACTURER_DATASHEET, PIN_NUMBER_SOURCE=INTERNAL_CONVENTION, Qualification_Status=UNQUALIFIED_PENDING_SAVE_REOPEN_AUDIT, Source_Baseline=POWER_SCHEMATIC_ENTRY_BASELINE_v0.17_FA.txt
C_MCU_BULK: library part C2012X5R1E475K125AB, "MCU-core ceramic capacitor", Manufacturer=TDK, Package="C2012 / EIA 0805", Datasheet=https://product.tdk.com/en/search/capacitor/ceramic/mlcc/info?part_no=C2012X5R1E475K125AB, Design_Status=DESIGN_LOCK_MCU_CORE_V2.1_REUSE_G009_PENDING_LINK, MPN=C2012X5R1E475K125AB, PIN_FUNCTION_SOURCE=MANUFACTURER_DATASHEET, PIN_NUMBER_SOURCE=INTERNAL_CONVENTION, Qualification_Status=UNQUALIFIED_PENDING_SAVE_REOPEN_AUDIT, Source_Baseline=MCU_SCHEMATIC_ENTRY_BASELINE_v2.1_FA.txt
C_OLED_BULK C_SD_MID C_SENSOR_BULK: library part GRM21BR61E106KA73L, "MicroSD local mid-value ceramic capacitor", Manufacturer="Murata Manufacturing", Package="2012M / EIA 0805", Datasheet=https://pim.murata.com/en-global/pim/details/?partNum=GRM21BR61E106KA73%23, Design_Status=DESIGN_LOCK_MICROSD_V1.2_FOOTPRINT_COMPARE_PENDING, MPN=GRM21BR61E106KA73L, PIN_FUNCTION_SOURCE=MANUFACTURER_PRODUCT_DATA, PIN_NUMBER_SOURCE=INTERNAL_CONVENTION_1_2, Qualification_Status=UNQUALIFIED_PENDING_SAVE_REOPEN_AUDIT, Source_Baseline=MICROSD_SCHEMATIC_ENTRY_BASELINE_v1.2_FA.txt
C_OUT: library part C2012X5R1A476M125AC, "3V3 output ceramic capacitor", Manufacturer=TDK, Package="0805 / 2012 metric", Datasheet="TDK exact product data C2012X5R1A476M125AC", Design_Status=CONTROLLED_V0.17_P9, MPN=C2012X5R1A476M125AC, PIN_FUNCTION_SOURCE=MANUFACTURER_DATASHEET, PIN_NUMBER_SOURCE=INTERNAL_CONVENTION, Qualification_Status=UNQUALIFIED_PENDING_SAVE_REOPEN_AUDIT, Source_Baseline=POWER_SCHEMATIC_ENTRY_BASELINE_v0.17_FA.txt
C_SD_BULK1 C_SD_BULK2: library part C2012X5R1E226M125AC, "MicroSD local bulk ceramic capacitor", Manufacturer=TDK, Package="C2012 / EIA 0805", Datasheet=https://product.tdk.com/en/search/capacitor/ceramic/mlcc/info?part_no=C2012X5R1E226M125AC, Design_Status=DESIGN_LOCK_MICROSD_V1.2_REUSE_CANDIDATE_PENDING_LINK, MPN=C2012X5R1E226M125AC, PIN_FUNCTION_SOURCE=MANUFACTURER_PRODUCT_DATA, PIN_NUMBER_SOURCE=INTERNAL_CONVENTION_1_2, Qualification_Status=UNQUALIFIED_PENDING_SAVE_REOPEN_AUDIT, Source_Baseline=MICROSD_SCHEMATIC_ENTRY_BASELINE_v1.2_FA.txt
D1 D_NAV1: "Five-line ESD protection array", Manufacturer=Semtech, Package=SC70-6, Datasheet=https://www.semtech.com/products/circuit-protection/esd-protection/smf05c, Design_Status=CONTROLLED_V0.17, MPN=SMF05C.TCT, PIN_FUNCTION_SOURCE=MANUFACTURER_DATASHEET, PIN_NUMBER_SOURCE=MANUFACTURER_DATASHEET, Qualification_Status=UNQUALIFIED_PENDING_SAVE_REOPEN_AUDIT, Source_Baseline=POWER_SCHEMATIC_ENTRY_BASELINE_v0.17_FA.txt
D_DELAY: "Fast switching diode; SOD323; pin 1 cathode K, pin 2 anode A for Task19 delay discharge path", Manufacturer="MULTISOURCE; FOOTPRINT GEOMETRY SOURCE=Diodes Incorporated", Package=SOD323, Datasheet=https://www.diodes.com/datasheet/download/1N4148WS.pdf, Design_Status=TASK19_BOM_DEVICE_GEOMETRY_DIODES_INC_REFERENCE, MPN=1N4148WS, PIN_FUNCTION_SOURCE=MANUFACTURER_DATASHEET, PIN_NUMBER_SOURCE=MANUFACTURER_DATASHEET, Qualification_Status=UNQUALIFIED_PENDING_SAVE_REOPEN_AUDIT, Source_Baseline="Datalogger_OLED_SHT3x_Final_BOM_RevA_v1.3_FA.pdf + TASK18_RTC_RELEASE_2026-08-22 + TASK19_CONTROLLED_DELTAS_2026-08-22"
D_ESD D_ESD1 D_ESD2 D_EXT1 D_EXT2 D_EXT3: "Two-line low-capacitance ESD protector; ST device purchased for Rev-A", Manufacturer=STMicroelectronics, Package=SOT23-6L, Datasheet=https://www.st.com/resource/en/datasheet/usblc6-2.pdf, Design_Status=DESIGN_LOCK_MICROSD_V1.2_ST_PROCUREMENT, MPN=USBLC6-2SC6, PIN_FUNCTION_SOURCE=MANUFACTURER_DATASHEET, PIN_NUMBER_SOURCE=MANUFACTURER_DATASHEET, Qualification_Status=UNQUALIFIED_PENDING_SAVE_REOPEN_AUDIT, Source_Baseline=MICROSD_SCHEMATIC_ENTRY_BASELINE_v1.2_FA.txt
F1: library part JFC2410-1200FS, "Battery input fast-acting fuse", Manufacturer="JDT Fuse", Package="2410 SMD", Datasheet=https://www.jdtfuse.com/upload/PDF/JFC2410FS.pdf, Design_Status=PROCUREMENT_LOCK_P9_PENDING, MPN=JFC2410-1200FS, PIN_FUNCTION_SOURCE=MANUFACTURER_DATASHEET, PIN_NUMBER_SOURCE=INTERNAL_CONVENTION, Qualification_Status=UNQUALIFIED_PENDING_SAVE_REOPEN_AUDIT, Source_Baseline=POWER_SCHEMATIC_ENTRY_BASELINE_v0.17_FA.txt
FB_SENSOR: library part BLM21PG221SN1D, "Murata BLM21PG ferrite bead, 0805/2012, Task19 sensor supply filter", Manufacturer="Murata Manufacturing Co., Ltd.", Package="0805 / 2012 metric", Datasheet="Murata official BLM21PG221SN1D product data", Design_Status=TASK19_CONTROLLED_BOM_REUSE_RES_0805_SHARED_2P, MPN=BLM21PG221SN1D, PIN_FUNCTION_SOURCE=SYMMETRIC_PASSIVE_DEVICE, PIN_NUMBER_SOURCE=INTERNAL_CONVENTION, Qualification_Status=UNQUALIFIED_PENDING_SAVE_REOPEN_AUDIT, Source_Baseline="Datalogger_OLED_SHT3x_Final_BOM_RevA_v1.3_FA.pdf + TASK18_RTC_RELEASE_2026-08-22 + TASK19_CONTROLLED_DELTAS_2026-08-22"
J1: library part USB_C_PANEL_LOGICAL, "Off-board USB-C panel connector logical interface", Manufacturer=PROJECT_LOGICAL, Package=LOGICAL_OFFBOARD, Datasheet=POWER_SCHEMATIC_ENTRY_BASELINE_v0.17_FA.txt, Design_Status=PROJECT_LOGICAL, MPN=USB_C_PANEL_LOGICAL, PIN_FUNCTION_SOURCE=PROJECT_LOGICAL_DEFINITION, PIN_NUMBER_SOURCE=PROJECT_LOGICAL_DEFINITION, Qualification_Status=UNQUALIFIED_PENDING_SAVE_REOPEN_AUDIT, Source_Baseline=POWER_SCHEMATIC_ENTRY_BASELINE_v0.17_FA.txt
J_EXP: library part J_EXP_2X8_MALE_P2P54_THT, "Internal rigid daughterboard expansion header; generic 2x8 male vertical THT; position 15 is KEY/NC and metal pin 15 shall be physically removed", Manufacturer=GENERIC, MPN=2X8-MALE-P2P54-THT, Package="THT 2x8 pitch 2.54 mm", Design_Status=T21_LOCK, Mechanical_Key="POSITION_15_NO_METAL_PIN; mating female cavity 15 shall be blocked", PIN_FUNCTION_SOURCE=EXPANSION_ARCHITECTURE_REVA_V1.0_PLUS_T21_DECISIONS, PIN_NUMBER_SOURCE=PROJECT_PHYSICAL_NUMBERING_LOCK_T21, Procurement="Iran generic 2.54mm double-row male header; Lion PLD-2.54-2X40GF may be cut to 2x8; equivalent allowed", Qualification_Status=GENERIC_GEOMETRY_LOCKED_PHYSICAL_SAMPLE_FIT_PENDING, Source_Baseline="T21_EXPANSION_DECISIONS_2026-08-28 + Expansion Architecture RevA v1.0"
J_EXP_PWR: library part J_EXP_PWR_2X2_MALE_P2P54_THT, "Internal daughterboard auxiliary power header; USB_5V_AUX output-only; valid only with rigid J_EXP mating so J_EXP key enforces orientation", Manufacturer=GENERIC, MPN=2X2-MALE-P2P54-THT, Package="THT 2x2 pitch 2.54 mm", Design_Status=T21_LOCK, PIN_FUNCTION_SOURCE=EXPANSION_ARCHITECTURE_REVA_V1.0, PIN_NUMBER_SOURCE=PROJECT_PHYSICAL_NUMBERING_LOCK_T21, Procurement="Iran generic 2.54mm double-row male header; cut from longer strip allowed", Qualification_Status=GENERIC_GEOMETRY_LOCKED, Source_Baseline="T21_EXPANSION_DECISIONS_2026-08-28 + Expansion Architecture RevA v1.0", Usage_Policy="RIGID_DAUGHTERBOARD_ONLY; NOT_FOR_STANDALONE_CABLE; OUTPUT_ONLY; NO_BACKFEED"
J_EXT: library part B06B-PASK-1N, "Protected external signal expansion port; JST PA 6-pin top-entry THT with boss; external modules are self-powered except low-current 3V3_REF", Manufacturer=JST, Package="PA family top-entry N type THT with boss, 6 circuits, 2.0 mm pitch", Datasheet="JST PA FAMILY ePA-F.pdf; B06B-PASK-1N", Design_Status=T21_LOCK, Mating_Housing=PAP-06V-S, MPN=B06B-PASK-1N, PIN_FUNCTION_SOURCE=T21_JEXT_SIGNAL_PORT_LOCK_2026-08-28, PIN_NUMBER_SOURCE=JST_CIRCUIT_NUMBERING, Port_Policy="SIGNAL_PORT; EXTERNAL_MODULES_SELF_POWERED; PIN2_3V3_REF_NOT_POWER_OUTPUT", Qualification_Status=MECHANICAL_DATASHEET_LOCKED_PHYSICAL_SAMPLE_FIT_PENDING, Source_Baseline="T21_EXPANSION_DECISIONS_2026-08-28 + JST official PA family"
J_NAV: library part "2.54mm-5P ZZ-MS", "Five-position vertical THT Navigation connector; SHOUHAN drawing pitch 2.50 mm", Manufacturer="SHENZHEN SHOUHAN TECHNOLOGY CO., LTD", Package="1x5 vertical THT; drawing pitch 2.50mm", Datasheet="SHOUHAN exact 2.54mm-5P ZZ-MS specification/drawing", Design_Status=DESIGN_LOCK_NAV_V1.0_JNAV, MPN="2.54mm-5P ZZ-MS", PIN_FUNCTION_SOURCE=NAVIGATION_V1.0_PROJECT_CONNECTOR_MAPPING, PIN_NUMBER_SOURCE=PROJECT_INTERNAL_CONVENTION_LEFT_TO_RIGHT, Qualification_Status=UNQUALIFIED_PENDING_SAVE_REOPEN_AUDIT, Source_Baseline=TASK17_NAVIGATION_ENTRY_BASELINE_v1.0_FA.txt
J_OLED: library part PBS-2.54-1X4GF, "Generic 1x4 straight female THT socket for OLED module; purchase identity PBS-2.54-1X4GF; module side is male", Manufacturer=GENERIC, Package="THT 1x4, pitch 2.54 mm", Datasheet="Generic geometry reference: Wurth Elektronik 61300411821; project user approval 2026-08-22", Design_Status=TASK19_GENERIC_HEADER_USER_APPROVED_2026-08-22, MPN=PBS-2.54-1X4GF, PIN_FUNCTION_SOURCE=OLED_MODULE_PRINT_AND_CONTROLLED_BOM, PIN_NUMBER_SOURCE=PROJECT_INTERNAL_LEFT_TO_RIGHT_1_TO_4, Qualification_Status=UNQUALIFIED_PENDING_SAVE_REOPEN_AUDIT, Source_Baseline="Datalogger_OLED_SHT3x_Final_BOM_RevA_v1.3_FA.pdf + TASK18_RTC_RELEASE_2026-08-22 + TASK19_CONTROLLED_DELTAS_2026-08-22"
J_SD: "microSD socket with card detect; pin table controlled by ATOM-A10248 Rev A0", Manufacturer="Shenzhen ATOM Technology", Package="Right-angle SMD/SMT microSD socket", Datasheet="ATOM-A10248 Rev A0 controlled local manufacturer drawing", Design_Status=DESIGN_LOCK_MICROSD_V1.2_SOCKET_DRAWING, MPN=MR01A-01245, PIN_FUNCTION_SOURCE=MANUFACTURER_DRAWING, PIN_NUMBER_SOURCE=MANUFACTURER_DRAWING, Qualification_Status=UNQUALIFIED_PENDING_SAVE_REOPEN_AUDIT, Source_Baseline=MICROSD_SCHEMATIC_ENTRY_BASELINE_v1.2_FA.txt
J_SENSOR_PCB: library part 2510-1X6-MALE-THT, "PCB-mounted internal SHT3x harness connector; 6-pin straight male 2.54 mm 2510-style THT; external metal/military panel connector remains separate", Manufacturer=GENERIC, Package="THT 1x6, pitch 2.54 mm", Datasheet="USER_SUPPLIED_6CCT_2P54_DRAWING_2026-08-26; supplier code 2171001040", Design_Status=TASK20_CONTROLLED_PCB_CONNECTOR, MPN=2510-1X6-MALE-THT, PIN_FUNCTION_SOURCE=USER_APPROVED_T20_SIGNAL_ORDER_2026-08-26, PIN_NUMBER_SOURCE=PROJECT_INTERNAL_PCB_ORDER_LOCK_2026-08-26, Qualification_Status=MECHANICAL_FIT_PENDING_PHYSICAL_SAMPLE, Source_Baseline=T20_USER_APPROVAL_2026-08-26
J_SHIELD: library part WIRE_DRAIN_1P_THT, "Dedicated PCB termination for external cable shield/drain wire; 1-pin THT solder pad; Task20 controlled", Manufacturer=GENERIC, Package="1-pin THT solder pad", Cable_Target="3-pair x 24AWG shielded, drain wire", Design_Status=TASK20_CONTROLLED, MPN=WIRE_DRAIN_1P_THT, Qualification_Status=PHYSICAL_FIT_PENDING
J_SWD: library part PLS-2.54-1X40GF, "1x40 2.54 mm stock strip; five positions used for SWD service header", Manufacturer="NINGBO GOSUN TECHNOLOGY CO.,LTD", Package="2.54 mm single-row pin header stock strip", Datasheet="Manufacturer PLS series ordering code; mechanical drawing still controlled HOLD", Design_Status=DESIGN_LOCK_MCU_CORE_V2.1_MECHANICAL_HOLD, MPN=PLS-2.54-1X40GF, PIN_FUNCTION_SOURCE=MCU_CORE_V2.1_PROJECT_MAPPING, PIN_NUMBER_SOURCE=INTERNAL_CONVENTION, Qualification_Status=UNQUALIFIED_PENDING_SAVE_REOPEN_AUDIT, Source_Baseline=MCU_SCHEMATIC_ENTRY_BASELINE_v2.1_FA.txt
L1: library part DFE322512F-1R0M=P2, "Shielded power inductor", Manufacturer=Murata, MPN=DFE322512F-1R0M=P2, Package=DFE3225, Datasheet="Murata DFE322512F product data", Design_Status=DESIGN_LOCK_V0.17_P9_PENDING, PIN_FUNCTION_SOURCE=MANUFACTURER_DATASHEET, PIN_NUMBER_SOURCE=INTERNAL_CONVENTION, Qualification_Status=UNQUALIFIED_PENDING_SAVE_REOPEN_AUDIT, Source_Baseline=POWER_SCHEMATIC_ENTRY_BASELINE_v0.17_FA.txt
Q_OLED Q_SD: "-30V P-channel MOSFET used as switched SD_VDD high-side pass element", Manufacturer="Alpha & Omega Semiconductor", Package=SOT-23, Datasheet=https://www.aosmd.com/sites/default/files/res/datasheets/AO3401A.pdf, Design_Status=DESIGN_LOCK_MICROSD_V1.2_PIN_NUMBER_CONVENTION_PENDING_FOOTPRINT_CROSSCHECK, MPN=AO3401A, PIN_FUNCTION_SOURCE=MANUFACTURER_DATASHEET, PIN_NUMBER_SOURCE=INTERNAL_CONVENTION_PENDING_PHYSICAL_ORIENTATION_CROSSCHECK, Qualification_Status=UNQUALIFIED_PENDING_SAVE_REOPEN_AUDIT, Source_Baseline=MICROSD_SCHEMATIC_ENTRY_BASELINE_v1.2_FA.txt
Q_OLED_DRV Q_SD_DRV: "45V 100mA NPN general-purpose transistor used as SD gate driver", Manufacturer=Nexperia, Package="SOT-23 / TO-236AB", Datasheet=https://assets.nexperia.com/documents/data-sheet/BC847X_SER.pdf, Design_Status=DESIGN_LOCK_MICROSD_V1.2, MPN=BC847B, PIN_FUNCTION_SOURCE=MANUFACTURER_DATASHEET, PIN_NUMBER_SOURCE=MANUFACTURER_DATASHEET, Qualification_Status=UNQUALIFIED_PENDING_SAVE_REOPEN_AUDIT, Source_Baseline=MICROSD_SCHEMATIC_ENTRY_BASELINE_v1.2_FA.txt
Q_OVP: "-20V P-channel enhancement MOSFET used as USB OVP switch", Manufacturer=FOSAN, Package=SOT-23, Datasheet=FSS2301S_FOSAN_Official.pdf, Design_Status=CONTROLLED_V0.17_P9, MPN=FSS2301S, PIN_FUNCTION_SOURCE=MANUFACTURER_DATASHEET, PIN_NUMBER_SOURCE=INTERNAL_CONVENTION, Qualification_Status=UNQUALIFIED_PENDING_SAVE_REOPEN_AUDIT, Source_Baseline=POWER_SCHEMATIC_ENTRY_BASELINE_v0.17_FA.txt
Q_OVP_DRV: "PNP transistor used as OVP gate driver", Manufacturer=onsemi, Package="SOT-23 / TO-236", Datasheet="onsemi BC856/BC857/BC858 manufacturer datasheet", Design_Status=CONTROLLED_V0.17_P9, MPN=BC857BLT1G, PIN_FUNCTION_SOURCE=MANUFACTURER_DATASHEET, PIN_NUMBER_SOURCE=MANUFACTURER_DATASHEET, Qualification_Status=UNQUALIFIED_PENDING_SAVE_REOPEN_AUDIT, Source_Baseline=POWER_SCHEMATIC_ENTRY_BASELINE_v0.17_FA.txt
R_BASE R_PR_TOP: library part 0603WAF3002T5E, "Power network resistor", Manufacturer=UNI-ROYAL, Package=0603, Datasheet="UNI-ROYAL manufacturer resistor data", Design_Status=DESIGN_LOCK_V0.17, MPN=0603WAF3002T5E, PIN_FUNCTION_SOURCE=MANUFACTURER_DATASHEET, PIN_NUMBER_SOURCE=INTERNAL_CONVENTION, Qualification_Status=UNQUALIFIED_PENDING_SAVE_REOPEN_AUDIT, Source_Baseline=POWER_SCHEMATIC_ENTRY_BASELINE_v0.17_FA.txt
R_BASE_PD R_BE_PU R_CD_PU R_CS_PU R_GATE R_MISO_PD R_OLED_BASE_PD R_OLED_GATE: library part 0603WAF1003T5E, "OVP resistor", Manufacturer=UNI-ROYAL, Package=0603, Datasheet="UNI-ROYAL manufacturer resistor data", Design_Status=CONTROLLED_V0.17_P9, MPN=0603WAF1003T5E, PIN_FUNCTION_SOURCE=MANUFACTURER_DATASHEET, PIN_NUMBER_SOURCE=INTERNAL_CONVENTION, Qualification_Status=UNQUALIFIED_PENDING_SAVE_REOPEN_AUDIT, Source_Baseline=POWER_SCHEMATIC_ENTRY_BASELINE_v0.17_FA.txt
R_BOTTOM_A R_GATE_PD R_PR_BOTTOM R_PULL1 R_PULL2 R_PULL3 R_PULL4 R_RTC_INT_PU R_ST_PU R_TOP_A: library part ARG05DTC1002, "Precision power network resistor", Manufacturer="Viking Tech", Package="0805 / ARG05", Datasheet="Viking Tech AR series product data", Design_Status=DESIGN_LOCK_V0.17, MPN=ARG05DTC1002, PIN_FUNCTION_SOURCE=MANUFACTURER_DATASHEET, PIN_NUMBER_SOURCE=INTERNAL_CONVENTION, Qualification_Status=UNQUALIFIED_PENDING_SAVE_REOPEN_AUDIT, Source_Baseline=POWER_SCHEMATIC_ENTRY_BASELINE_v0.17_FA.txt
R_BOTTOM_B R_DELAY: library part 0603WAF4702T5E, "OVP resistor", Manufacturer=UNI-ROYAL, Package=0603, Datasheet="UNI-ROYAL manufacturer resistor data", Design_Status=CONTROLLED_V0.17_P9, MPN=0603WAF4702T5E, PIN_FUNCTION_SOURCE=MANUFACTURER_DATASHEET, PIN_NUMBER_SOURCE=INTERNAL_CONVENTION, Qualification_Status=UNQUALIFIED_PENDING_SAVE_REOPEN_AUDIT, Source_Baseline=POWER_SCHEMATIC_ENTRY_BASELINE_v0.17_FA.txt
R_CC1 R_CC2: library part FRC0603F5101TS, "USB-C Rd resistor", Manufacturer="FOJAN / FOSAN Technology", Package=0603, Datasheet="FRC0603F5101TS-UniOhm.pdf / FOSAN FRC Series FJ-JS-3001-V3.0", Design_Status=DESIGN_LOCK_V0.17, MPN=FRC0603F5101TS, PIN_FUNCTION_SOURCE=MANUFACTURER_DATASHEET, PIN_NUMBER_SOURCE=INTERNAL_CONVENTION, Qualification_Status=UNQUALIFIED_PENDING_SAVE_REOPEN_AUDIT, Source_Baseline=POWER_SCHEMATIC_ENTRY_BASELINE_v0.17_FA.txt
R_EXP_PWR_EN R_MODE R_SHIELD: library part SER0603J0R, "Zero-ohm mode strap", Manufacturer="VICO / Anhui Xiangsheng Technology", Package=0603, Datasheet=SER0603J0R-VO-Sub-Brand-(ER).pdf, Design_Status=DESIGN_LOCK_V0.17, MPN=SER0603J0R, PIN_FUNCTION_SOURCE=MANUFACTURER_DATASHEET, PIN_NUMBER_SOURCE=INTERNAL_CONVENTION, Qualification_Status=UNQUALIFIED_PENDING_SAVE_REOPEN_AUDIT, Source_Baseline=POWER_SCHEMATIC_ENTRY_BASELINE_v0.17_FA.txt
R_EXT_CTRL R_EXT_SCL R_EXT_SDA: library part 0603WAF3300T5E, "External-port series resistor; 330 ohm 1% 100mW 0603", Manufacturer=UNI-ROYAL, Package=0603, Power=100mW, Datasheet="UNI-ROYAL 0603WAF3300T5E / LCSC C23138", Design_Status=T21_LOCK, MPN=0603WAF3300T5E, PIN_FUNCTION_SOURCE=PASSIVE_RESISTOR, PIN_NUMBER_SOURCE=INTERNAL_CONVENTION, Qualification_Status=CONTROLLED, Source_Baseline=T21_JEXT_PROTECTION_LOCK_2026-08-28
R_EXT_IN R_EXT_REF R_K1 R_K2 R_K3 R_SER1 R_SER2 R_SER3 R_SER4: library part 0805W8F1001T5E, "OVP series resistor", Manufacturer=UNI-ROYAL, Package=0805, Datasheet="UNI-ROYAL manufacturer resistor data", Design_Status=CONTROLLED_V0.17_P9, MPN=0805W8F1001T5E, PIN_FUNCTION_SOURCE=MANUFACTURER_DATASHEET, PIN_NUMBER_SOURCE=INTERNAL_CONVENTION, Qualification_Status=UNQUALIFIED_PENDING_SAVE_REOPEN_AUDIT, Source_Baseline=POWER_SCHEMATIC_ENTRY_BASELINE_v0.17_FA.txt
R_FB_BOTTOM R_HYST: library part 0805W8F9102T5E, "Power feedback/hysteresis resistor", Manufacturer=UNI-ROYAL, Package=0805, Datasheet="UNI-ROYAL manufacturer resistor data", Design_Status=DESIGN_LOCK_V0.17, MPN=0805W8F9102T5E, PIN_FUNCTION_SOURCE=MANUFACTURER_DATASHEET, PIN_NUMBER_SOURCE=INTERNAL_CONVENTION, Qualification_Status=UNQUALIFIED_PENDING_SAVE_REOPEN_AUDIT, Source_Baseline=POWER_SCHEMATIC_ENTRY_BASELINE_v0.17_FA.txt
R_FB_TOP R_TOP_B: library part 1206W4F5103T5E, "Power feedback resistor", Manufacturer=UNI-ROYAL, Package=1206, Datasheet="UNI-ROYAL manufacturer resistor data", Design_Status=DESIGN_LOCK_V0.17, MPN=1206W4F5103T5E, PIN_FUNCTION_SOURCE=MANUFACTURER_DATASHEET, PIN_NUMBER_SOURCE=INTERNAL_CONVENTION, Qualification_Status=UNQUALIFIED_PENDING_SAVE_REOPEN_AUDIT, Source_Baseline=POWER_SCHEMATIC_ENTRY_BASELINE_v0.17_FA.txt
R_MISO: library part SER0603F22R, "MicroSD MISO series resistor", Manufacturer="VO Sub Brand (ER) [supplier-listed]", Package=0603, Datasheet=https://lionelectronic.ir/products/1154-SER0603F22R, Design_Status=DESIGN_LOCK_MICROSD_V1.2_FOOTPRINT_SOURCE_HOLD, MPN=SER0603F22R, PIN_FUNCTION_SOURCE=CONTROLLED_BOM_PLUS_SUPPLIER_LISTING, PIN_NUMBER_SOURCE=INTERNAL_CONVENTION_1_2, Qualification_Status=UNQUALIFIED_PENDING_SAVE_REOPEN_AUDIT, Source_Baseline=MICROSD_SCHEMATIC_ENTRY_BASELINE_v1.2_FA.txt
R_OLED_BASE R_SD_DRV_BASE: library part CR0603FA1002G, "MicroSD SD gate-driver base resistor", Manufacturer="LIZ [supplier-listed]", Package=0603, Datasheet="MicroSD v1.3 plus exact-part supplier listing", Design_Status=DESIGN_LOCK_MICROSD_V1.2_FOOTPRINT_SOURCE_HOLD, MPN=CR0603FA1002G, PIN_FUNCTION_SOURCE=CONTROLLED_BOM_PLUS_EXACT_PART_LISTING, PIN_NUMBER_SOURCE=INTERNAL_CONVENTION_1_2, Qualification_Status=UNQUALIFIED_PENDING_SAVE_REOPEN_AUDIT, Source_Baseline=MICROSD_SCHEMATIC_ENTRY_BASELINE_v1.2_FA.txt
R_SCL_PU R_SDA_PU: library part 0603WAF2401T5E, "Task19 external SHT3x I2C pull-up resistor", Manufacturer=UNI-ROYAL, Package="0603 / 1608 metric", Datasheet="Controlled BOM value/package; existing UNI-ROYAL WAF family in released project library", Design_Status=TASK19_CONTROLLED_BOM_REUSE_RES_0603_SHARED_2P, MPN=0603WAF2401T5E, PIN_FUNCTION_SOURCE=SYMMETRIC_PASSIVE_DEVICE, PIN_NUMBER_SOURCE=INTERNAL_CONVENTION, Qualification_Status=UNQUALIFIED_PENDING_SAVE_REOPEN_AUDIT, Source_Baseline="Datalogger_OLED_SHT3x_Final_BOM_RevA_v1.3_FA.pdf + TASK18_RTC_RELEASE_2026-08-22 + TASK19_CONTROLLED_DELTAS_2026-08-22"
R_SCL_SER R_SDA_SER: library part 0603WAF470JT5E, "Task19 SHT3x I2C series resistor", Manufacturer=UNI-ROYAL, Package="0603 / 1608 metric", Datasheet="Controlled BOM value/package; existing UNI-ROYAL WAF family in released project library", Design_Status=TASK19_CONTROLLED_BOM_REUSE_RES_0603_SHARED_2P, MPN=0603WAF470JT5E, PIN_FUNCTION_SOURCE=SYMMETRIC_PASSIVE_DEVICE, PIN_NUMBER_SOURCE=INTERNAL_CONVENTION, Qualification_Status=UNQUALIFIED_PENDING_SAVE_REOPEN_AUDIT, Source_Baseline="Datalogger_OLED_SHT3x_Final_BOM_RevA_v1.3_FA.pdf + TASK18_RTC_RELEASE_2026-08-22 + TASK19_CONTROLLED_DELTAS_2026-08-22"
S1: library part S1_4POLE_MAINTAINED_OFFBOARD, "Four independent maintained off-board switch contacts", Manufacturer=PROJECT_LOGICAL, Package=LOGICAL_OFFBOARD, Datasheet=POWER_SCHEMATIC_ENTRY_BASELINE_v0.17_FA.txt, Design_Status=PROJECT_LOGICAL_MECH_HOLD, MPN=S1_4POLE_MAINTAINED_OFFBOARD, PIN_FUNCTION_SOURCE=PROJECT_LOGICAL_DEFINITION, PIN_NUMBER_SOURCE=PROJECT_LOGICAL_DEFINITION, Qualification_Status=UNQUALIFIED_PENDING_SAVE_REOPEN_AUDIT, Source_Baseline=POWER_SCHEMATIC_ENTRY_BASELINE_v0.17_FA.txt
SW_RESET: library part TP-1101A_6X6X5_THT, "Generic TP-1101A-compatible momentary SPST-NO tactile switch; 6x6x5 mm; four-pin THT; sample fit pending", Manufacturer=MULTISOURCE, MPN=TP-1101A_COMPATIBLE_6X6X5, Package="6x6x5 mm THT 4-pin; PCB pitch 6.5x4.5 mm", Datasheet="Omron B3F 6x6 THT geometry reference; procurement sample controls final fit", Design_Status=T23_CONTROLLED_ADDITIVE_DELTA, PIN_FUNCTION_SOURCE=RAIL_A_1_2_RAIL_B_3_4, PIN_NUMBER_SOURCE=OMRON_B3F_REFERENCE_TOP_VIEW, Qualification_Status=SAMPLE_FIT_PENDING, Source_Baseline="Datalogger Rev-A post-BT2 controlled library, user-confirmed 2026-09-03"
TP_3V3_SYS TP_BAT_FUSED TP_BAT_RAW TP_BAT_SW TP_OVP_K TP_OVP_REF TP_PR1 TP_QG TP_RTC_INT TP_USB_OVP_IN TP_USB_PROT TP_USB_RAW TP_VBAT TP_VIN_MUX: library part TESTPOINT_GENERIC, "Generic schematic test point", Manufacturer=PROJECT_LOGICAL, Package=LOGICAL, Datasheet=POWER_SCHEMATIC_ENTRY_BASELINE_v0.17_FA.txt, Design_Status=PROJECT_LOGICAL, MPN=TESTPOINT_GENERIC, PIN_FUNCTION_SOURCE=PROJECT_LOGICAL_DEFINITION, PIN_NUMBER_SOURCE=PROJECT_LOGICAL_DEFINITION, Qualification_Status=UNQUALIFIED_PENDING_SAVE_REOPEN_AUDIT, Source_Baseline=POWER_SCHEMATIC_ENTRY_BASELINE_v0.17_FA.txt
U_MCU: "Main MCU for Datalogger Rev-A; controlled 32-pin package map", Manufacturer=STMicroelectronics, Package="LQFP32 7x7 mm P0.8", Datasheet=https://www.st.com/resource/en/datasheet/stm32g070kb.pdf, Design_Status=DESIGN_LOCK_MCU_CORE_V2.1, MPN=STM32G070KBT6, PIN_FUNCTION_SOURCE=MANUFACTURER_DATASHEET, PIN_NUMBER_SOURCE=MANUFACTURER_DATASHEET, Qualification_Status=UNQUALIFIED_PENDING_SAVE_REOPEN_AUDIT, Source_Baseline=MCU_SCHEMATIC_ENTRY_BASELINE_v2.1_FA.txt
U_OLED_SW: "Nexperia quad SPST analog switch; enable inputs active HIGH; SO14 SOT108-1", Manufacturer=Nexperia, Package="SO14 / SOT108-1", Datasheet=https://assets.nexperia.com/documents/data-sheet/74HC_HCT4066.pdf, Design_Status=TASK19_CONTROLLED_NEXPERIA_REV12, MPN=74HC4066D,653, PIN_FUNCTION_SOURCE=MANUFACTURER_DATASHEET, PIN_NUMBER_SOURCE=MANUFACTURER_DATASHEET, Qualification_Status=UNQUALIFIED_PENDING_SAVE_REOPEN_AUDIT, Source_Baseline="Datalogger_OLED_SHT3x_Final_BOM_RevA_v1.3_FA.pdf + TASK18_RTC_RELEASE_2026-08-22 + TASK19_CONTROLLED_DELTAS_2026-08-22"
U_OVP_REF: "Programmable shunt reference, B grade", Manufacturer="Taiwan Semiconductor", Package=SOT-23, Datasheet=https://services.taiwansemi.com/storage/resources/datasheet/TS431_K2412.pdf, Design_Status=CONTROLLED_V0.17_P9, MPN="TS431BCX RFG", PIN_FUNCTION_SOURCE=MANUFACTURER_DATASHEET, PIN_NUMBER_SOURCE=MANUFACTURER_DATASHEET, Qualification_Status=UNQUALIFIED_PENDING_SAVE_REOPEN_AUDIT, Source_Baseline=POWER_SCHEMATIC_ENTRY_BASELINE_v0.17_FA.txt
U_PMUX: "Power multiplexer with priority control", Manufacturer="Texas Instruments", Package="DRL / SOT-5X3-8", Datasheet=https://www.ti.com/lit/ds/symlink/tps2116.pdf, Design_Status=CONTROLLED_V0.17_P9, MPN=TPS2116DRLR, PIN_FUNCTION_SOURCE=MANUFACTURER_DATASHEET, PIN_NUMBER_SOURCE=MANUFACTURER_DATASHEET, Qualification_Status=UNQUALIFIED_PENDING_SAVE_REOPEN_AUDIT, Source_Baseline=POWER_SCHEMATIC_ENTRY_BASELINE_v0.17_FA.txt
U_RTC: "Analog Devices/Maxim DS3231 industrial I2C RTC/TCXO, 16-SO W16#H2", Manufacturer="Analog Devices / Maxim Integrated", Package="16 SO, 300 mil, W16#H2", Package_Outline=21-0042, Datasheet="Analog Devices DS3231 Rev.10", Land_Pattern=90-0107, MPN=DS3231SN#, PIN_FUNCTION_SOURCE=MANUFACTURER_DATASHEET, PIN_NUMBER_SOURCE=MANUFACTURER_DATASHEET, Qualification_Status=UNQUALIFIED_PENDING_SAVE_REOPEN_AUDIT, Source_Baseline=Datalogger_RTC_CR2032_Final_BOM_RevA_v1.2_FA.pdf
U_SD_BUF: "Quad buffer/line driver with 3-state outputs; OE active-low", Manufacturer=Nexperia, Package="SO14 / SOT108-1", Datasheet=https://assets.nexperia.com/documents/data-sheet/74HC_HCT125.pdf, Design_Status=DESIGN_LOCK_MICROSD_V1.2, MPN=74HC125D,653, PIN_FUNCTION_SOURCE=MANUFACTURER_DATASHEET, PIN_NUMBER_SOURCE=MANUFACTURER_DATASHEET, Qualification_Status=UNQUALIFIED_PENDING_SAVE_REOPEN_AUDIT, Source_Baseline=MICROSD_SCHEMATIC_ENTRY_BASELINE_v1.2_FA.txt
U_SYS: "3.3V system buck-boost converter", Manufacturer="Texas Instruments", Package="DRL / SOT-5X3-8", Datasheet=https://www.ti.com/lit/ds/symlink/tps631000.pdf, Design_Status=DESIGN_LOCK_V0.17_P9_PENDING, MPN=TPS631000DRLR, PIN_FUNCTION_SOURCE=MANUFACTURER_DATASHEET, PIN_NUMBER_SOURCE=MANUFACTURER_DATASHEET, Qualification_Status=UNQUALIFIED_PENDING_SAVE_REOPEN_AUDIT, Source_Baseline=POWER_SCHEMATIC_ENTRY_BASELINE_v0.17_FA.txt
Z_OVP: "6.2V zener gate-source clamp", Manufacturer="Diodes Incorporated", Package=SOD-123, Datasheet=https://www.diodes.com/datasheet/download/BZT52Cxx.pdf, Design_Status=CONTROLLED_V0.17_P9, MPN=BZT52C6V2-7-F, PIN_FUNCTION_SOURCE=MANUFACTURER_DATASHEET, PIN_NUMBER_SOURCE=INTERNAL_CONVENTION, Qualification_Status=UNQUALIFIED_PENDING_SAVE_REOPEN_AUDIT, Source_Baseline=POWER_SCHEMATIC_ENTRY_BASELINE_v0.17_FA.txt

## Free pads (board coordinates)
  round 125.98 hole 125.98 unplated: 1(4095,6920) 2(7710,6920) 3(7700,4110) 4(4105,4105)